# Altium PCB MainBoardPCB_4.PcbDoc (part 23 of 32)
Units mm, origin at the board's own origin, x right, y up, seen from the top; angles counter-clockwise.
Board outline 333.63 x 349.38 mm, 16 copper layers (L1, L2 (GND), L3 (Sign), L4 (GND), L5 (Sign), L6 (PWR/GND), L7(PWR/GND), L8 (Plane_GND), L9 (PWR/GND), L10 (PWR/GND), L11 (PWR/GND), L12 (Sign), L13 (GND), L14 (Sign), L15 (GND), L16), stack 2.502 mm thick; 2205 components, 1648 nets, 8314 pads, 3172 vias.
Unrouted connection lines stored in the file: 5141.
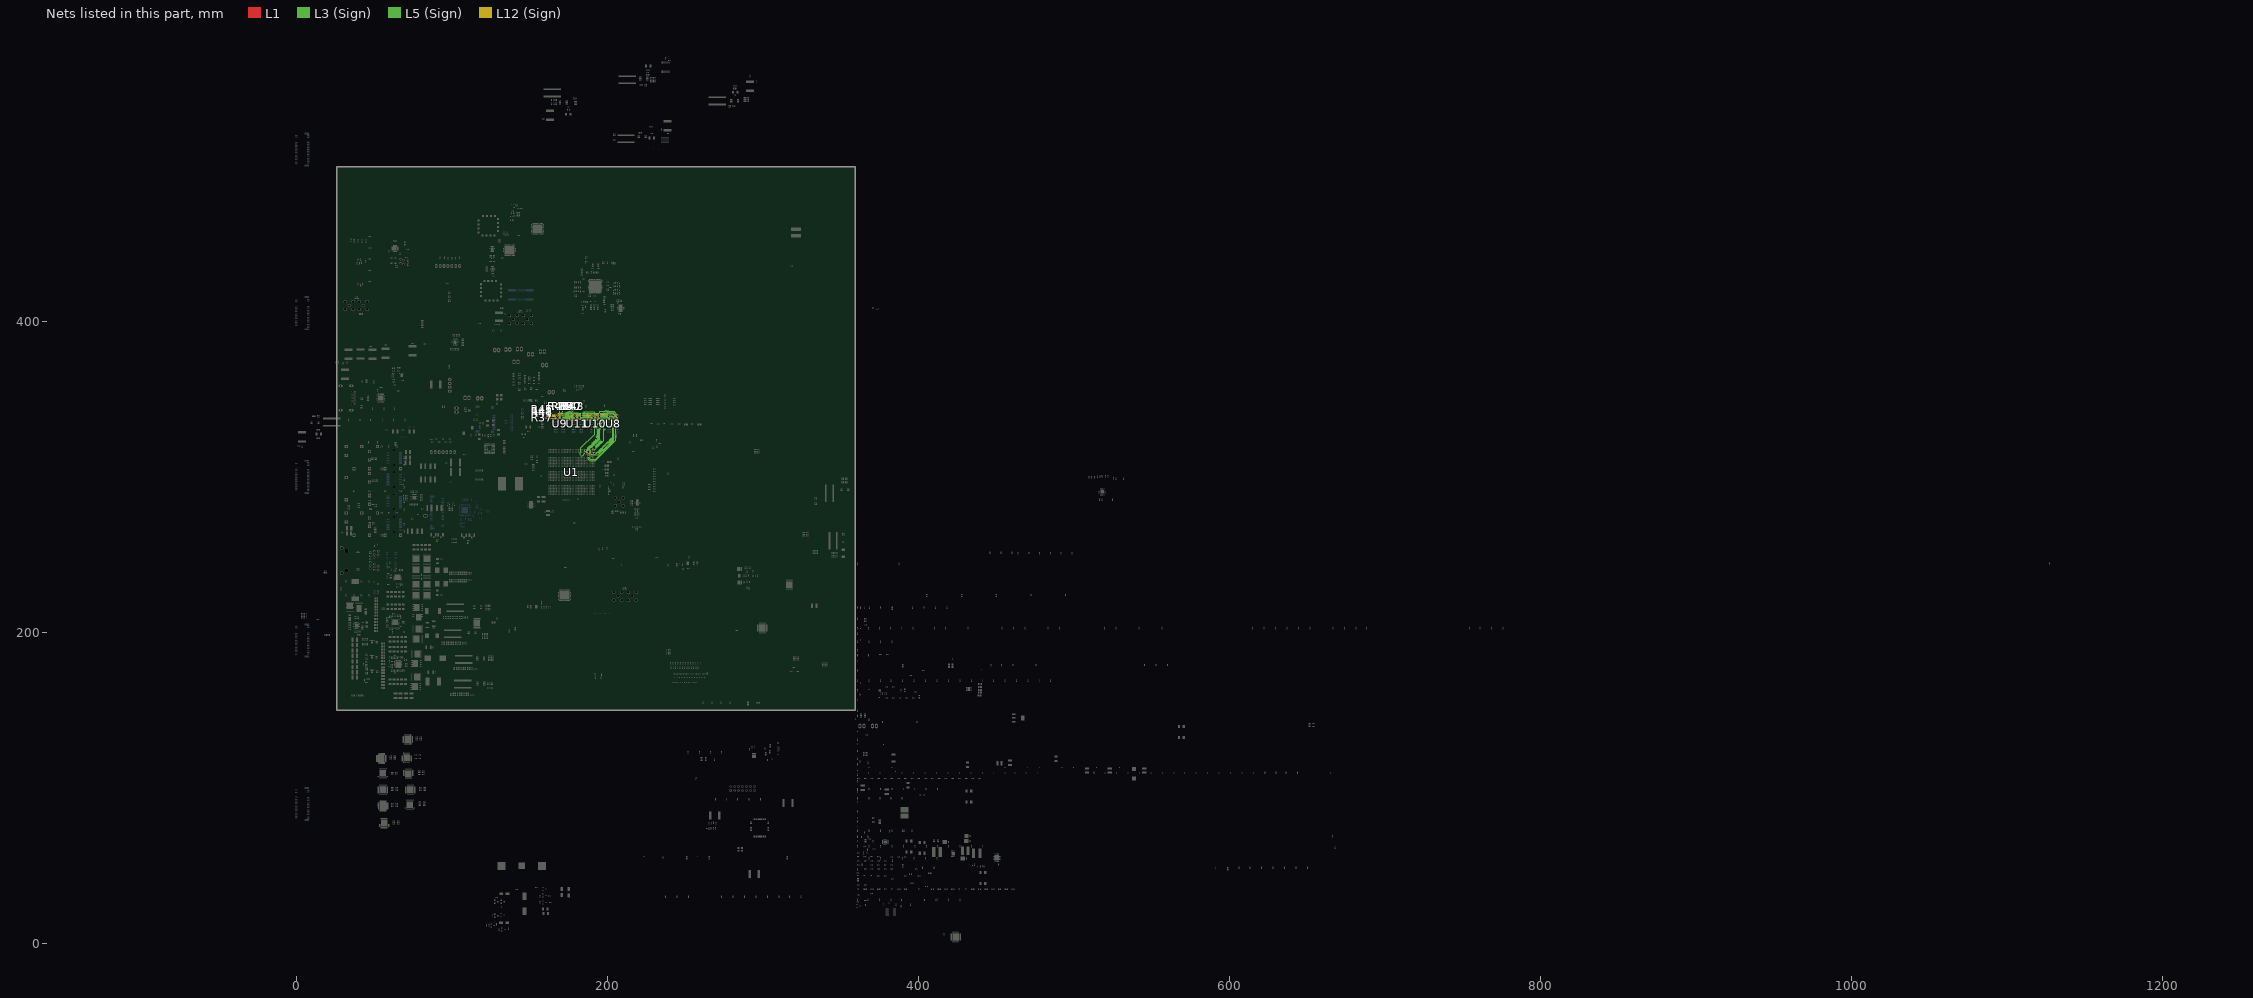
[diagram p23: the nets of this part, all layers, seen from the top]

## Via types
v1: diameter 0.5, hole 0.2, L1 to L16, tented both sides, 1153 vias
v2: diameter 0.5/0.35/0.35/0.35/0.35/0.35/0.35/0.35/0.35/0.35/0.35/0.35/0.35/0.35/0.35/0.5 (per signal layer), hole 0.2, L1 to L16, tented both sides, 548 vias
v3: diameter 0.5, hole 0.2, L1 to L16, 522 vias
v4: diameter 0.5/0.35/0.35/0.35/0.35/0.35/0.35/0.35/0.35/0.35/0.35/0.35/0.35/0.35/0.35/0.5 (per signal layer), hole 0.15, L1 to L16, tented both sides, 266 vias
v5: diameter 0.8, hole 0.4, L1 to L16, tented both sides, 164 vias
v6: diameter 0.35/0/0.35 (per signal layer), hole 0.127, L1 to L3 (Sign), tented both sides, 132 vias
v7: diameter 2.54, hole 1.02, L1 to L16, 125 vias
v8: diameter 1.4, hole 0.5, L1 to L16, tented both sides, 80 vias
v9: diameter 0.35, hole 0.127, L1 to L2 (GND), tented both sides, 36 vias
v10: diameter 0.4, hole 0.2, L1 to L16, 16 vias
v11: diameter 0.25, hole 0.2, L1 to L16, 16 vias
v12: diameter 5, hole 3, L1 to L16, 15 vias
v13: diameter 0.3, hole 0.2, L1 to L16, 15 vias
v14: diameter 0.45, hole 0.15, L1 to L16, 12 vias
v15: diameter 0.5/0.35/0.35/0.35/0.35/0.35/0.35/0.35/0.35/0.35/0.35/0.35/0.35/0.35/0.35/0.45 (per signal layer), hole 0.15, L1 to L16, tented both sides, 10 vias
v16: diameter 0.2/0/0.2 (per signal layer), hole 0.1, L1 to L3 (Sign), tented both sides, 9 vias
v17: diameter 0.4, hole 0.1, L1 to L16, 7 vias
v18: diameter 0.5, hole 0.2, L3 (Sign) to L6 (PWR/GND), tented both sides, 6 vias
v19: diameter 1.65, hole 1.65, L1 to L16, 6 vias
v20: diameter 1.15, hole 1.15, L1 to L16, 6 vias
v21: diameter 0.35/0/0.35 (per signal layer), hole 0.127, L14 (Sign) to L16, tented both sides, 5 vias
v22: diameter 0.2, hole 0.1, L1 to L16, 4 vias
v23: diameter 0.4, hole 0.2, L1 to L16, tented both sides, 2 vias
v24: diameter 0.4, hole 0.15, L1 to L16, 2 vias
v25: diameter 0.508, hole 0.127, L1 to L2 (GND), 2 vias
v26: diameter 0.508, hole 0.127, L2 (GND) to L3 (Sign), 2 vias
v27: diameter 0.5/0.35/0.35/0.35/0.35/0.35/0.35/0.35/0.35/0.35/0.35/0.35/0.35/0.35/0.35/0.5 (per signal layer), hole 0.15, L1 to L16, 2 vias
v28: diameter 0.35, hole 0.127, L3 (Sign) to L6 (PWR/GND), tented both sides, 2 vias
v29: diameter 5.5, hole 3.5, L1 to L16, 1 vias
v30: diameter 0.5/0.35/0.35/0.35/0.35/0.35/0.35/0.35/0.35/0.35/0.35/0.35/0.35/0.35/0.35/0.5 (per signal layer), hole 0.2, L1 to L16, 1 vias
v31: diameter 0.35/0.35/0.35 (per signal layer), hole 0.127, L1 to L3 (Sign), tented both sides, 1 vias
v32: diameter 0.45/0/0.45 (per signal layer), hole 0.15, L1 to L3 (Sign), tented both sides, 1 vias
v33: diameter 0.45/0/0.45 (per signal layer), hole 0.2, L14 (Sign) to L16, tented both sides, 1 vias
v34: diameter 0.35, hole 0.127, L2 (GND) to L3 (Sign), 1 vias
v35: diameter 0.35, hole 0.127, L1 to L2 (GND), 1 vias

## Nets (pads, with @x,y where several pads share a name; then routed paths per layer and width w, separated by ;. In a path a pad name is that pad's centre, name@x,y a point inside that pad or via, vN(x,y) a via of type N, cw(c..) or ccw(c..) an arc to the next point about the centre after c; other vN are vias at no path point) (continued)
DDR4_A3: R37.1 U1.AJ30 U8.N4 U9.N4 U10.N4 U11.N4 | length 99.3
  L1 w0.116: U9.N4@167.676,337.66 168.072,338.057 v4(168.075,338.057) ; U11.N4@179.136,337.66 179.533,338.057 v4(179.535,338.057) ; U1.AJ30@190.397,317.539 v6(190.884,318.027) ; U10.N4@190.597,337.66 190.993,338.057 v4(190.995,338.057) ; U8.N4@202.057,337.66 202.453,338.057 v4(202.456,338.057)
  L1 w0.155: R37.1@158.737,337.967 v1(159.982,337.967)
  L12 (Sign) w0.092: 165.251,337.661 166.76,337.661 167.508,337.661 167.896,338.049 v4(168.075,338.057) ; v4@168.075,338.049 168.821,338.049 169.171,337.698 173.927,337.698 175.389,337.698 cw(c175.389,337.609) 175.479,337.609 175.479,337.545 ccw(c175.568,337.545) 175.568,337.456 175.837,337.456 ccw(c175.837,337.545) 175.927,337.545 175.927,337.698 175.927,337.773 cw(c176.016,337.773) 176.016,337.863 176.285,337.863 cw(c176.285,337.773) 176.374,337.773 176.374,337.698 176.374,337.545 ccw(c176.464,337.545) 176.464,337.456 176.733,337.456 ccw(c176.733,337.545) 176.822,337.545 176.822,337.609 cw(c176.912,337.609) 176.912,337.698 177.046,337.698 177.931,337.698 177.934,337.695 178.053,337.695 178.053,337.698 178.201,337.698 178.201,337.695 178.32,337.695 178.323,337.698 178.831,337.698 179.189,338.057 v4@179.533,338.057 ; v4(179.535,338.057) 180.56,338.057 180.95,337.668 184.651,337.668 185.134,338.15 186.39,338.15 186.616,338.15 cw(c186.616,338.081) 186.685,338.081 186.685,337.958 ccw(c186.754,337.958) 186.754,337.889 186.962,337.889 ccw(c186.962,337.958) 187.031,337.958 187.031,338.15 187.031,338.183 cw(c187.1,338.183) 187.1,338.252 187.308,338.252 cw(c187.308,338.183) 187.377,338.183 187.377,338.15 187.377,337.958 ccw(c187.446,337.958) 187.446,337.889 187.654,337.889 ccw(c187.654,337.958) 187.723,337.958 187.723,338.081 cw(c187.793,338.081) 187.793,338.15 187.897,338.15 189.219,338.15 189.633,337.736 190.504,337.736 190.817,338.049 191.312,338.049 191.662,337.698 193.827,337.698 194.311,337.698 cw(c194.311,337.609) 194.4,337.609 ; 194.4,337.608 ccw(c194.49,337.608) 194.49,337.519 194.759,337.519 ccw(c194.759,337.608) 194.848,337.608 ; 194.848,337.609 cw(c194.938,337.609) 194.938,337.698 195.072,337.698 195.123,337.698 195.458,337.363 196.532,337.363 197.232,337.363 cw(c197.232,337.273) 197.321,337.273 197.321,337.214 ccw(c197.411,337.214) 197.411,337.125 197.68,337.125 ccw(c197.68,337.214) 197.769,337.214 197.769,337.273 cw(c197.859,337.273) 197.859,337.363 197.993,337.363 198.352,337.363 ccw(c198.352,337.452) 198.442,337.452 198.442,337.5 cw(c198.531,337.5) 198.531,337.59 198.8,337.59 cw(c198.8,337.5) 198.89,337.5 198.89,337.363 198.89,337.214 ccw(c198.979,337.214) 198.979,337.125 199.248,337.125 ccw(c199.248,337.214) 199.337,337.214 199.337,337.363 cw(c199.427,337.363) 199.427,337.452 199.696,337.452 cw(c199.696,337.363) 199.785,337.363 199.785,337.214 ccw(c199.875,337.214) 199.875,337.125 200.143,337.125 ccw(c200.143,337.214) 200.233,337.214 200.233,337.273 cw(c200.322,337.273) 200.322,337.363 200.457,337.363 201.112,337.363 201.447,337.698 202.097,337.698 v4(202.456,338.057)
  L12 (Sign) w0.151: v1(159.982,337.967) 160.623,337.967 160.928,337.661 165.251,337.661
  L3 (Sign) w0.092: v6(190.884,318.027) 190.884,317.789 191.329,317.344 191.726,317.344 191.867,317.484 192.147,317.765 192.428,318.046 192.709,318.327 192.919,318.537 ccw(c192.849,318.607) 192.919,318.677 192.123,319.474 cw(c192.193,319.544) 192.123,319.614 192.263,319.755 cw(c192.333,319.684) 192.403,319.755 193.2,318.958 ccw(c193.27,319.028) 193.34,318.958 193.481,319.099 ccw(c193.411,319.169) 193.481,319.239 192.684,320.035 cw(c192.754,320.106) 192.684,320.176 192.825,320.316 cw(c192.895,320.246) 192.965,320.316 193.761,319.52 ccw(c193.832,319.59) 193.902,319.52 194.042,319.66 ccw(c193.972,319.73) 194.042,319.8 193.246,320.597 cw(c193.316,320.667) 193.246,320.737 193.386,320.878 cw(c193.456,320.807) 193.526,320.878 194.323,320.081 ccw(c194.393,320.151) 194.463,320.081 194.604,320.221 ccw(c194.533,320.292) 194.604,320.362 193.807,321.158 cw(c193.877,321.228) 193.807,321.299 193.947,321.439 cw(c194.018,321.369) 194.088,321.439 194.884,320.642 ccw(c194.954,320.713) 195.025,320.642 195.165,320.783 ccw(c195.095,320.853) 195.165,320.923 194.368,321.72 cw(c194.439,321.79) 194.368,321.86 194.509,322 cw(c194.579,321.93) 194.649,322 195.446,321.204 ccw(c195.516,321.274) 195.586,321.204 195.726,321.344 ccw(c195.656,321.414) 195.726,321.485 194.93,322.281 cw(c195,322.351) 194.93,322.422 195.07,322.562 cw(c195.14,322.492) 195.211,322.562 196.007,321.765 ccw(c196.077,321.836) 196.148,321.765 196.288,321.906 ccw(c196.218,321.976) 196.288,322.046 195.491,322.843 cw(c195.562,322.913) 195.491,322.983 195.632,323.123 cw(c195.702,323.053) 195.772,323.123 196.569,322.327 ccw(c196.639,322.397) 196.709,322.327 196.92,322.537 197.2,322.818 197.574,323.192 197.574,329.171 197.574,330.229 cw(c197.673,330.229) 197.673,330.328 198.456,330.328 ccw(c198.456,330.427) 198.555,330.427 198.555,330.626 ccw(c198.456,330.626) 198.456,330.725 197.574,330.725 cw(c197.574,330.824) 197.475,330.824 197.475,331.023 cw(c197.574,331.023) 197.574,331.122 197.75,331.122 ccw(c197.75,331.221) 197.849,331.221 197.849,331.42 ccw(c197.75,331.42) 197.75,331.519 197.574,331.519 cw(c197.574,331.618) 197.475,331.618 197.475,331.817 cw(c197.574,331.817) 197.574,331.916 ccw(c197.574,332.015) 197.673,332.015 197.673,332.214 ccw(c197.574,332.214) 197.574,332.313 197.574,332.511 197.574,334.379 200.822,337.627 202.026,337.627 v4(202.456,338.057)
DDR4_A4: R39.1 U1.AK28 U8.N3 U9.N3 U10.N3 U11.N3 | length 98.4
  L1 w0.116: v4(170.472,338.064) U9.N3@170.876,337.66 ; v30(181.933,338.064) U11.N3@182.336,337.66 ; U1.AK28@191.397,315.539 v6(192.086,315.539) ; v4(193.393,338.064) U10.N3@193.797,337.66 ; v15(204.853,338.064) U8.N3@205.257,337.66
  L1 w0.155: v1(171.229,343.555) R39.1@171.229,344.8
  L5 (Sign) w0.092: 170.437,341.085 169.784,340.433 169.784,338.752 v4(170.472,338.064) 171.003,338.064 171.4,338.46 173.698,338.46 173.832,338.46 ccw(c173.832,338.55) 173.922,338.55 173.922,338.672 cw(c174.011,338.672) 174.011,338.762 174.28,338.762 cw(c174.28,338.672) 174.37,338.672 174.37,338.46 174.37,338.249 ccw(c174.459,338.249) 174.459,338.159 174.728,338.159 ccw(c174.728,338.249) 174.817,338.249 174.817,338.371 cw(c174.907,338.371) 174.907,338.46 175.997,338.46 180.482,338.46 180.878,338.064 v30(181.933,338.064) 182.713,338.064 183.109,338.46 185.801,338.46 185.974,338.46 186.251,338.46 cw(c186.251,338.391) 186.32,338.391 186.32,338.15 ccw(c186.39,338.15) 186.39,338.081 186.597,338.081 ccw(c186.597,338.15) 186.666,338.15 186.666,338.46 186.666,338.77 cw(c186.736,338.77) 186.736,338.84 186.943,338.84 cw(c186.943,338.77) 187.013,338.77 187.013,338.53 ccw(c187.082,338.53) 187.082,338.46 187.82,338.46 191.942,338.46 192.339,338.064 v4(193.393,338.064) 193.924,338.064 194.366,338.506 194.564,338.506 196.327,338.506 cw(c196.327,338.416) 196.417,338.416 196.417,338.348 ccw(c196.506,338.348) 196.506,338.258 196.775,338.258 ccw(c196.775,338.348) 196.864,338.348 196.864,338.506 196.864,338.82 cw(c196.954,338.82) 196.954,338.91 197.223,338.91 cw(c197.223,338.82) 197.312,338.82 197.312,338.595 ccw(c197.402,338.595) 197.402,338.506 197.67,338.506 ccw(c197.67,338.595) 197.76,338.595 197.76,338.82 cw(c197.849,338.82) 197.849,338.91 198.118,338.91 cw(c198.118,338.82) 198.208,338.82 198.208,338.595 ccw(c198.297,338.595) 198.297,338.506 198.566,338.506 ccw(c198.566,338.595) 198.656,338.595 198.656,338.82 cw(c198.745,338.82) 198.745,338.91 199.014,338.91 cw(c199.014,338.82) 199.103,338.82 199.103,338.595 ccw(c199.193,338.595) 199.193,338.506 199.462,338.506 ccw(c199.462,338.595) 199.551,338.595 199.551,338.82 cw(c199.641,338.82) 199.641,338.91 199.909,338.91 cw(c199.909,338.82) 199.999,338.82 199.999,338.595 ccw(c200.088,338.595) 200.088,338.506 200.447,338.506 200.805,338.506 cw(c200.805,338.416) 200.895,338.416 200.895,338.348 ccw(c200.984,338.348) 200.984,338.258 201.253,338.258 ccw(c201.253,338.348) 201.342,338.348 201.342,338.416 cw(c201.432,338.416) 201.432,338.506 201.701,338.506 cw(c201.701,338.416) 201.79,338.416 201.79,338.403 ccw(c201.88,338.403) 201.88,338.314 202.148,338.314 ccw(c202.148,338.403) 202.238,338.403 202.238,338.506 202.238,338.82 cw(c202.327,338.82) 202.327,338.91 202.596,338.91 cw(c202.596,338.82) 202.686,338.82 202.686,338.506 202.686,338.317 ccw(c202.775,338.317) 202.775,338.227 203.044,338.227 ccw(c203.044,338.317) 203.134,338.317 203.134,338.416 cw(c203.223,338.416) 203.223,338.506 203.357,338.506 203.799,338.064 v15(204.853,338.064)
  L5 (Sign) w0.151: 170.437,341.085 171.229,341.878 v1(171.229,343.555)
  L3 (Sign) w0.092: v6(192.086,315.539) 192.317,315.539 192.416,315.539 ccw(c192.416,315.639) 192.515,315.639 192.515,315.688 cw(c192.615,315.688) 192.615,315.787 192.813,315.787 cw(c192.813,315.688) 192.912,315.688 192.912,315.539 192.912,315.189 ccw(c193.012,315.189) 193.012,315.089 193.21,315.089 ccw(c193.21,315.189) 193.309,315.189 193.309,315.44 cw(c193.409,315.44) 193.409,315.539 193.543,315.539 193.684,315.68 ; 193.683,315.68 cw(c193.753,315.75) 193.683,315.821 193.823,315.961 cw(c193.894,315.891) 193.964,315.961 ; 193.964,315.961 194.466,315.459 ccw(c194.536,315.529) 194.606,315.459 194.746,315.6 ccw(c194.676,315.67) 194.746,315.74 194.245,316.241 cw(c194.312,316.309) 194.245,316.376 194.391,316.522 cw(c194.458,316.454) 194.526,316.522 195.027,316.021 ccw(c195.097,316.091) 195.167,316.021 195.308,316.161 ccw(c195.238,316.231) 195.308,316.301 194.806,316.803 cw(c194.874,316.87) 194.806,316.938 194.952,317.083 cw(c195.02,317.016) 195.087,317.083 195.588,316.582 ccw(c195.659,316.652) 195.729,316.582 195.869,316.722 ccw(c195.799,316.793) 195.869,316.863 195.368,317.364 cw(c195.435,317.432) 195.368,317.499 195.514,317.645 cw(c195.581,317.577) 195.649,317.645 196.15,317.144 ccw(c196.22,317.214) 196.29,317.144 196.431,317.284 ccw(c196.36,317.354) 196.431,317.424 195.929,317.926 cw(c195.997,317.993) 195.929,318.06 196.075,318.206 cw(c196.143,318.139) 196.21,318.206 196.711,317.705 ccw(c196.782,317.775) 196.852,317.705 196.992,317.845 ccw(c196.922,317.916) 196.992,317.986 196.491,318.487 cw(c196.558,318.554) 196.491,318.622 196.637,318.768 cw(c196.704,318.7) 196.772,318.768 196.848,318.691 ccw(c196.919,318.761) 196.989,318.691 197.129,318.831 ccw(c197.059,318.901) 197.129,318.971 197.052,319.048 cw(c197.12,319.116) 197.052,319.183 197.198,319.329 cw(c197.265,319.262) 197.333,319.329 197.41,319.252 ccw(c197.48,319.322) 197.55,319.252 197.691,319.393 ccw(c197.62,319.463) 197.691,319.533 197.614,319.61 cw(c197.681,319.677) 197.614,319.745 197.759,319.891 cw(c197.827,319.823) 197.894,319.891 197.971,319.814 ccw(c198.042,319.884) 198.112,319.814 198.252,319.954 ccw(c198.182,320.024) 198.252,320.094 198.175,320.171 cw(c198.243,320.239) 198.175,320.306 198.321,320.452 cw(c198.388,320.385) 198.456,320.452 198.533,320.375 ccw(c198.603,320.445) 198.673,320.375 198.814,320.515 ccw(c198.743,320.586) 198.814,320.656 198.737,320.733 cw(c198.804,320.8) 198.737,320.868 198.882,321.013 cw(c198.95,320.946) 199.017,321.013 199.094,320.937 ccw(c199.164,321.007) 199.235,320.937 199.375,321.077 ccw(c199.305,321.147) 199.375,321.217 199.298,321.294 cw(c199.365,321.362) 199.298,321.429 199.444,321.575 cw(c199.511,321.507) 199.579,321.575 199.656,321.498 ccw(c199.726,321.568) 199.796,321.498 199.936,321.638 ccw(c199.866,321.709) 199.936,321.779 199.859,321.856 cw(c199.927,321.923) 199.859,321.991 200.005,322.136 cw(c200.073,322.069) 200.14,322.136 200.354,321.923 ccw(c200.424,321.993) 200.494,321.923 200.635,322.063 ccw(c200.564,322.133) 200.635,322.203 200.421,322.417 cw(c200.488,322.485) 200.421,322.552 200.567,322.698 cw(c200.634,322.63) 200.702,322.698 200.867,322.532 ccw(c200.938,322.602) 201.008,322.532 201.148,322.672 ccw(c201.078,322.743) 201.148,322.813 200.982,322.979 cw(c201.05,323.046) 200.982,323.113 201.128,323.259 cw(c201.196,323.192) 201.263,323.259 201.429,323.094 ccw(c201.499,323.164) 201.569,323.094 201.71,323.234 ccw(c201.639,323.304) 201.71,323.374 201.544,323.54 cw(c201.611,323.607) 201.544,323.675 201.69,323.821 cw(c201.757,323.753) 201.824,323.821 201.99,323.655 ccw(c202.06,323.725) 202.131,323.655 202.271,323.795 ccw(c202.201,323.865) 202.271,323.936 202.105,324.101 cw(c202.173,324.169) 202.105,324.236 202.251,324.382 cw(c202.318,324.315) 202.386,324.382 202.552,324.216 ccw(c202.622,324.287) 202.692,324.216 202.832,324.357 ccw(c202.762,324.427) 202.832,324.497 202.737,324.593 cw(c202.807,324.663) 202.737,324.733 202.927,324.923 203.434,325.43 203.434,335.975 203.707,336.248 203.707,338.149 203.987,338.43 204.642,338.43 204.853,338.218 v15(204.853,338.064)
DDR4_A5: R41.1 U1.AK27 U8.P5 U9.P5 U10.P5 U11.P5 | length 98
  L1 w0.116: U9.P5@166.876,338.46 167.272,338.857 v4(167.275,338.857) ; U11.P5@178.336,338.46 178.733,338.857 v4(178.735,338.857) ; U10.P5@189.797,338.46 190.193,338.857 v4(190.196,338.857) ; U1.AK27@191.397,314.539 v6(191.884,315.027) ; v4(200.853,338.864) U8.P5@201.257,338.46
  L1 w0.155: R41.1@158.737,341.233 v1(159.982,341.233)
  L12 (Sign) w0.092: 165.251,338.857 166.751,338.857 v4(167.275,338.857) 167.465,339.047 167.688,339.047 167.842,339.201 168.3,339.201 169.159,340.06 173.807,340.06 174.282,339.585 174.472,339.395 cw(c174.409,339.332) 174.472,339.269 174.437,339.233 ccw(c174.5,339.17) 174.437,339.106 174.627,338.916 ccw(c174.69,338.98) 174.753,338.916 174.789,338.952 cw(c174.852,338.889) 174.915,338.952 175.01,338.857 v4(178.735,338.857) 179.053,338.857 179.451,339.255 180.302,339.255 181.127,340.081 184.125,340.081 184.945,339.26 186.576,339.26 187.06,339.26 cw(c187.06,339.191) 187.129,339.191 187.129,339.18 ccw(c187.199,339.18) 187.199,339.111 187.406,339.111 ccw(c187.406,339.18) 187.476,339.18 187.476,339.26 187.476,339.337 cw(c187.545,339.337) 187.545,339.407 187.752,339.407 cw(c187.752,339.337) 187.822,339.337 187.822,339.26 187.822,339.18 ccw(c187.891,339.18) 187.891,339.111 188.099,339.111 ccw(c188.099,339.18) 188.168,339.18 188.168,339.191 cw(c188.237,339.191) 188.237,339.26 188.341,339.26 189.268,339.26 189.672,338.857 v4(190.196,338.857) 190.385,339.047 190.609,339.047 190.763,339.201 191.22,339.201 192.08,340.06 195.846,340.06 196.524,339.382 197.193,339.382 198.16,339.382 cw(c198.16,339.293) 198.25,339.293 198.25,338.968 ccw(c198.339,338.968) 198.339,338.878 198.608,338.878 ccw(c198.608,338.968) 198.697,338.968 198.697,339.382 198.697,339.496 cw(c198.787,339.496) 198.787,339.586 199.056,339.586 cw(c199.056,339.496) 199.145,339.496 199.145,339.382 199.145,338.968 ccw(c199.235,338.968) 199.235,338.878 199.504,338.878 ccw(c199.504,338.968) 199.593,338.968 199.593,339.293 cw(c199.683,339.293) 199.683,339.382 199.817,339.382 200.342,338.857 v4@200.861,338.857
  L12 (Sign) w0.151: v1(159.982,341.233) 160.607,341.233 161.446,340.395 161.491,340.395 163.029,338.857 165.251,338.857
  L3 (Sign) w0.092: 189.328,315.928 189.328,316.31 188.563,317.074 188.563,318.187 188.633,318.257 ccw(c188.563,318.327) 188.633,318.398 188.63,318.401 cw(c188.701,318.471) 188.63,318.541 188.771,318.681 cw(c188.841,318.611) 188.911,318.681 188.984,318.608 189.016,318.576 ccw(c189.087,318.646) 189.157,318.576 189.297,318.717 ccw(c189.227,318.787) 189.297,318.857 189.265,318.889 189.192,318.962 cw(c189.262,319.032) 189.192,319.103 189.332,319.243 cw(c189.402,319.173) 189.473,319.243 189.546,319.17 189.786,318.929 ccw(c189.856,319) 189.926,318.929 190.067,319.07 ccw(c189.997,319.14) 190.067,319.21 189.827,319.45 189.753,319.524 cw(c189.823,319.594) 189.753,319.664 189.894,319.804 cw(c189.964,319.734) 190.034,319.804 190.107,319.731 190.347,319.491 ccw(c190.418,319.561) 190.488,319.491 190.628,319.631 ccw(c190.558,319.701) 190.628,319.772 190.388,320.012 190.315,320.085 cw(c190.385,320.155) 190.315,320.225 190.455,320.366 cw(c190.525,320.296) 190.595,320.366 190.669,320.293 190.909,320.052 ccw(c190.979,320.123) 191.049,320.052 191.19,320.193 ccw(c191.119,320.263) 191.19,320.333 190.949,320.573 190.876,320.647 cw(c190.946,320.717) 190.876,320.787 191.016,320.927 cw(c191.087,320.857) 191.157,320.927 191.23,320.854 191.47,320.614 ccw(c191.54,320.684) 191.611,320.614 191.751,320.754 ccw(c191.681,320.824) 191.751,320.895 191.511,321.135 191.438,321.208 cw(c191.508,321.278) 191.438,321.348 191.578,321.489 cw(c191.648,321.419) 191.718,321.489 191.792,321.415 192.032,321.175 ccw(c192.102,321.245) 192.172,321.175 192.312,321.316 ccw(c192.242,321.386) 192.312,321.456 192.072,321.696 191.999,321.769 cw(c192.069,321.84) 191.999,321.91 192.139,322.05 cw(c192.21,321.98) 192.28,322.05 192.353,321.977 192.593,321.737 ccw(c192.663,321.807) 192.734,321.737 192.874,321.877 ccw(c192.804,321.947) 192.874,322.017 192.634,322.258 192.56,322.331 cw(c192.631,322.401) 192.56,322.471 192.701,322.612 cw(c192.771,322.541) 192.841,322.612 192.914,322.538 193.155,322.298 ccw(c193.225,322.368) 193.295,322.298 193.435,322.439 ccw(c193.365,322.509) 193.435,322.579 193.195,322.819 193.122,322.892 cw(c193.192,322.962) 193.122,323.033 193.262,323.173 cw(c193.332,323.103) 193.403,323.173 193.476,323.1 193.716,322.86 ccw(c193.786,322.93) 193.856,322.86 193.997,323 ccw(c193.927,323.07) 193.997,323.14 193.757,323.38 193.683,323.454 cw(c193.754,323.524) 193.683,323.594 193.824,323.734 cw(c193.894,323.664) 193.964,323.734 194.037,323.661 194.278,323.421 ccw(c194.348,323.491) 194.418,323.421 194.558,323.561 ccw(c194.488,323.632) 194.558,323.702 194.318,323.942 194.245,324.015 cw(c194.315,324.085) 194.245,324.156 194.385,324.296 cw(c194.455,324.226) 194.526,324.296 194.599,324.223 194.839,323.982 ccw(c194.909,324.053) 194.979,323.982 195.12,324.123 ccw(c195.049,324.193) 195.12,324.263 194.95,324.433 cw(c195.02,324.503) 194.95,324.574 195.212,324.836 195.212,330.648 195.631,331.067 195.631,331.483 196.438,332.29 196.438,334.652 200.643,338.857 200.861,338.857 v4(200.853,338.864) ; 189.332,315.928 189.332,315.746 188.956,315.37 188.907,315.37 188.718,315.182 188.718,314.916 188.907,314.728 189.391,314.728 189.605,314.514 190.167,314.514 190.322,314.668 191.091,314.668 191.271,314.847 191.271,315.413 191.419,315.562 191.671,315.562 191.711,315.522 191.711,315.2 v6(191.884,315.027)
DDR4_A6: R43.1 U1.AF27 U8.P2 U9.P2 U10.P2 U11.P2 | length 102.8
  L1 w0.116: U9.P2@171.676,338.46 v4(172.079,338.864) ; U11.P2@183.136,338.46 v4(183.54,338.864) ; U1.AF27@187.397,314.539 v6(187.884,314.052) ; U10.P2@194.597,338.46 v4(195,338.864) ; U8.P2@206.057,338.46 v4(206.461,338.864)
  L1 w0.155: v6(178.481,343.555) R43.1@178.481,344.799
  L5 (Sign) w0.092: v4(172.079,338.864) 173.515,338.864 173.911,339.26 174.6,339.26 174.734,339.26 ccw(c174.734,339.35) 174.823,339.35 174.823,339.393 cw(c174.913,339.393) 174.913,339.482 175.182,339.482 cw(c175.182,339.393) 175.271,339.393 175.271,339.26 175.271,339.128 ccw(c175.361,339.128) 175.361,339.039 175.63,339.039 ccw(c175.63,339.128) 175.719,339.128 175.719,339.171 cw(c175.809,339.171) 175.809,339.26 176.187,339.26 180.228,339.26 181.008,338.48 182.583,338.48 182.966,338.864 v4(183.54,338.864) 183.839,338.864 184.217,339.242 184.404,339.242 184.577,339.242 184.854,339.242 cw(c184.854,339.173) 184.923,339.173 184.923,339.008 ccw(c184.993,339.008) 184.993,338.939 185.2,338.939 ccw(c185.2,339.008) 185.269,339.008 185.269,339.242 185.269,339.477 cw(c185.339,339.477) 185.339,339.546 185.546,339.546 cw(c185.546,339.477) 185.616,339.477 185.616,339.312 ccw(c185.685,339.312) 185.685,339.242 186.195,339.242 191.707,339.242 192.469,338.48 194.043,338.48 194.427,338.864 v4(195,338.864) 195.227,338.864 195.623,339.26 195.77,339.26 196.189,339.26 cw(c196.189,339.171) 196.279,339.171 196.279,339.017 ccw(c196.369,339.017) 196.369,338.927 196.637,338.927 ccw(c196.637,339.017) 196.727,339.017 196.727,339.26 196.727,339.523 cw(c196.816,339.523) 196.816,339.613 197.085,339.613 cw(c197.085,339.523) 197.175,339.523 197.175,339.26 197.175,339.192 ccw(c197.264,339.192) 197.264,339.103 197.533,339.103 ccw(c197.533,339.192) 197.622,339.192 197.622,339.26 197.622,339.523 cw(c197.712,339.523) 197.712,339.613 197.981,339.613 cw(c197.981,339.523) 198.07,339.523 198.07,339.26 198.07,339.192 ccw(c198.16,339.192) 198.16,339.103 198.428,339.103 ccw(c198.428,339.192) 198.518,339.192 198.518,339.26 198.518,339.523 cw(c198.608,339.523) 198.608,339.613 198.876,339.613 cw(c198.876,339.523) 198.966,339.523 198.966,339.26 198.966,339.192 ccw(c199.055,339.192) 199.055,339.103 199.324,339.103 ccw(c199.324,339.192) 199.414,339.192 199.414,339.26 199.414,339.523 cw(c199.503,339.523) 199.503,339.613 199.772,339.613 cw(c199.772,339.523) 199.861,339.523 199.861,339.26 199.861,339.192 ccw(c199.951,339.192) 199.951,339.103 200.22,339.103 ccw(c200.22,339.192) 200.309,339.192 200.309,339.26 200.309,339.295 cw(c200.399,339.295) 200.399,339.385 200.667,339.385 cw(c200.667,339.295) 200.757,339.295 200.757,339.26 ccw(c200.833,339.26) 200.833,339.185 201.129,339.185 ccw(c201.129,339.26) 201.205,339.26 201.429,339.26 203.149,339.26 203.944,338.465 204.078,338.465 ccw(c204.078,338.555) 204.168,338.555 204.168,338.578 cw(c204.257,338.578) 204.257,338.668 204.526,338.668 cw(c204.526,338.578) 204.616,338.578 204.616,338.555 ccw(c204.705,338.555) 204.705,338.465 204.98,338.465 205.489,338.465 205.887,338.864 v4(206.461,338.864)
  L3 (Sign) w0.092: v4(172.079,338.864) 173.022,339.807 174.25,339.807 174.969,340.525 176.05,340.525 176.611,341.085 ; v6(187.884,314.052) 187.884,314.03 188.511,313.403 188.511,311.882 188.986,311.406 192.691,311.406 197.601,316.317 197.671,316.387 ccw(c197.601,316.457) 197.671,316.527 197.317,316.882 cw(c197.387,316.953) 197.317,317.023 197.457,317.163 cw(c197.527,317.093) 197.597,317.163 197.952,316.808 ccw(c198.022,316.878) 198.093,316.808 198.233,316.949 ccw(c198.163,317.019) 198.233,317.089 197.878,317.444 cw(c197.948,317.514) 197.878,317.584 198.018,317.725 cw(c198.088,317.654) 198.159,317.725 198.514,317.37 ccw(c198.584,317.44) 198.654,317.37 198.794,317.51 ccw(c198.724,317.58) 198.794,317.65 198.439,318.005 cw(c198.51,318.076) 198.439,318.146 198.58,318.286 cw(c198.65,318.216) 198.72,318.286 199.075,317.931 ccw(c199.145,318.001) 199.215,317.931 199.356,318.071 ccw(c199.286,318.142) 199.356,318.212 199.001,318.567 cw(c199.071,318.637) 199.001,318.707 199.141,318.847 cw(c199.211,318.777) 199.282,318.847 199.636,318.493 ccw(c199.707,318.563) 199.777,318.493 199.917,318.633 ccw(c199.847,318.703) 199.917,318.773 199.562,319.129 cw(c199.632,319.199) 199.562,319.269 199.702,319.409 cw(c199.772,319.339) 199.843,319.409 200.198,319.054 ccw(c200.268,319.124) 200.338,319.054 200.549,319.265 202.023,320.738 204.01,322.725 204.01,335.707 204.363,336.06 205.816,336.06 206.088,336.332 206.088,337.358 205.791,337.655 205.791,338.496 206.148,338.853 206.449,338.853 v4(206.461,338.864)
  L3 (Sign) w0.151: 176.611,341.085 178.486,342.961 178.486,343.55 v6(178.481,343.555)
DDR4_A7: R45.1 U1.AE27 U8.R5 U9.R5 U10.R5 U11.R5 | length 100.7
  L1 w0.116: U9.R5@166.876,339.26 v4(167.279,339.664) ; U11.R5@178.336,339.26 178.733,339.657 v4(178.735,339.657) ; U1.AE27@186.397,314.539 v6(186.884,315.027) v6@186.884,315.052 ; U10.R5@189.797,339.26 190.193,339.657 v4(190.195,339.657) ; v4(200.853,339.664) U8.R5@201.257,339.26
  L1 w0.155: R45.1@158.737,343.411 v1(159.982,343.411)
  L12 (Sign) w0.092: 165.251,340.06 166.076,340.06 166.576,339.56 167.178,339.56 168.598,340.981 174.981,340.981 175.248,340.981 cw(c175.248,340.891) 175.338,340.891 ccw(c175.427,340.891) 175.427,340.802 175.696,340.802 ccw(c175.696,340.891) 175.785,340.891 cw(c175.875,340.891) 175.875,340.981 176.009,340.981 176.93,340.06 178.332,340.06 v4(178.735,339.657) 178.926,339.657 179.248,339.979 180.276,339.979 181.331,341.033 183.851,341.033 184.027,340.858 186.118,340.858 186.416,340.858 ccw(c186.416,340.927) 186.485,340.927 186.485,340.965 cw(c186.554,340.965) 186.554,341.034 186.762,341.034 cw(c186.762,340.965) 186.831,340.965 186.831,340.858 186.831,340.751 ccw(c186.9,340.751) 186.9,340.682 187.108,340.682 ccw(c187.108,340.751) 187.177,340.751 187.177,340.789 cw(c187.247,340.789) 187.247,340.858 187.35,340.858 188.995,340.858 v4(190.195,339.657) ; v4@190.098,339.56 v4(190.195,339.657) ; v4@200.853,339.657 200.449,339.657 199.466,340.639 199.314,340.639 198.92,340.639 cw(c198.92,340.729) 198.83,340.729 198.83,340.798 ccw(c198.741,340.798) 198.741,340.887 198.472,340.887 ccw(c198.472,340.798) 198.382,340.798 198.382,340.639 198.382,340.481 cw(c198.293,340.481) 198.293,340.392 198.024,340.392 cw(c198.024,340.481) 197.935,340.481 197.935,340.639 197.935,340.798 ccw(c197.845,340.798) 197.845,340.887 197.576,340.887 ccw(c197.576,340.798) 197.487,340.798 197.487,340.639 197.487,340.481 cw(c197.397,340.481) 197.397,340.392 197.129,340.392 cw(c197.129,340.481) 197.039,340.481 197.039,340.639 197.039,340.798 ccw(c196.95,340.798) 196.95,340.887 196.681,340.887 ccw(c196.681,340.798) 196.591,340.798 196.591,340.729 cw(c196.502,340.729) 196.502,340.639 196.367,340.639 196.026,340.981 191.519,340.981 v4(190.195,339.657)
  L12 (Sign) w0.151: v1(159.982,343.411) 161.325,343.411 164.676,340.06 165.251,340.06
  L3 (Sign) w0.092: v6(186.884,315.027) 186.884,315.074 186.615,315.344 185.419,316.539 185.419,317.004 185.788,317.373 186.627,317.373 187.413,318.148 187.554,318.287 187.598,318.331 187.669,318.4 ccw(c187.599,318.471) 187.67,318.541 187.526,318.687 cw(c187.596,318.757) 187.527,318.828 187.668,318.967 cw(c187.738,318.896) 187.808,318.966 188.023,318.749 188.068,318.703 ccw(c188.139,318.772) 188.208,318.702 188.35,318.841 ccw(c188.28,318.912) 188.351,318.981 188.305,319.028 188.083,319.253 cw(c188.154,319.323) 188.084,319.394 188.225,319.533 cw(c188.295,319.462) 188.366,319.532 188.588,319.306 188.629,319.264 ccw(c188.7,319.334) 188.77,319.263 188.911,319.403 ccw(c188.841,319.473) 188.912,319.543 188.871,319.585 188.676,319.782 cw(c188.747,319.852) 188.677,319.922 188.819,320.062 cw(c188.888,319.991) 188.959,320.061 189.153,319.864 189.191,319.826 ccw(c189.262,319.895) 189.331,319.825 189.473,319.964 ccw(c189.403,320.035) 189.474,320.104 189.436,320.142 189.428,320.15 cw(c189.499,320.22) 189.429,320.291 189.571,320.43 cw(c189.64,320.359) 189.711,320.429 ; 189.711,320.429 189.695,320.445 ccw(c189.719,320.469) 189.743,320.445 190.002,320.7 190.066,320.764 190.137,320.834 ccw(c190.067,320.904) 190.138,320.974 189.949,321.166 cw(c190.02,321.235) 189.95,321.306 190.092,321.445 cw(c190.161,321.375) 190.232,321.444 190.491,321.182 190.519,321.153 ccw(c190.589,321.223) 190.659,321.152 190.8,321.292 ccw(c190.731,321.362) 190.801,321.432 190.773,321.461 190.506,321.731 cw(c190.577,321.801) 190.507,321.872 190.649,322.011 cw(c190.718,321.94) 190.789,322.01 191.056,321.739 191.08,321.715 ccw(c191.151,321.785) 191.22,321.714 191.362,321.853 ccw(c191.292,321.924) 191.363,321.994 191.339,322.018 191.072,322.289 cw(c191.142,322.359) 191.073,322.429 191.214,322.569 cw(c191.284,322.498) 191.354,322.568 191.621,322.297 191.642,322.276 ccw(c191.712,322.346) 191.782,322.275 191.923,322.415 ccw(c191.854,322.485) 191.924,322.555 191.904,322.575 191.633,322.85 cw(c191.704,322.92) 191.634,322.991 191.775,323.13 cw(c191.845,323.059) 191.916,323.129 192.187,322.854 192.203,322.838 ccw(c192.274,322.907) 192.343,322.837 192.485,322.976 ccw(c192.415,323.047) 192.486,323.117 192.47,323.133 192.195,323.412 cw(c192.265,323.481) 192.196,323.552 192.337,323.692 cw(c192.407,323.621) 192.477,323.691 192.752,323.412 192.764,323.399 ccw(c192.835,323.469) 192.905,323.398 193.046,323.538 ccw(c192.976,323.608) 193.047,323.678 ; 193.047,323.678 193.063,323.662 cw(c193.092,323.69) 193.064,323.718 193.661,324.307 193.764,324.409 ; 193.764,324.508 193.764,324.409 ; v4(200.853,339.664) 200.804,339.615 200.541,339.615 195.387,334.46 194.068,334.46 193.764,334.156 193.764,333.439 192.865,332.54 192.865,331.238 193.764,330.34 193.764,330.141 cw(c193.764,330.083) 193.822,330.083 193.822,329.802 cw(c193.764,329.802) 193.764,329.744 193.764,329.347 cw(c193.764,329.291) 193.82,329.291 193.82,329.006 cw(c193.764,329.006) 193.764,328.95 193.63,328.95 ccw(c193.63,328.851) 193.531,328.851 193.531,328.652 ccw(c193.63,328.652) 193.63,328.553 193.764,328.553 cw(c193.764,328.497) 193.82,328.497 193.82,328.212 cw(c193.764,328.212) 193.764,328.156 193.764,327.759 cw(c193.764,327.703) 193.82,327.703 193.82,327.418 cw(c193.764,327.418) 193.764,327.362 193.65,327.362 ccw(c193.65,327.263) 193.55,327.263 193.55,327.064 ccw(c193.65,327.064) 193.65,326.965 193.764,326.965 cw(c193.764,326.909) 193.82,326.909 193.82,326.624 cw(c193.764,326.624) 193.764,326.568 192.965,326.568 ccw(c192.965,326.469) 192.865,326.469 192.865,326.27 ccw(c192.965,326.27) 192.965,326.171 193.764,326.171 cw(c193.764,326.115) 193.82,326.115 193.82,325.83 cw(c193.764,325.83) 193.764,325.774 192.965,325.774 ccw(c192.965,325.675) 192.865,325.675 192.865,325.476 ccw(c192.965,325.476) 192.965,325.377 193.764,325.377 194.28,325.377 cw(c194.28,325.278) 194.379,325.278 194.379,325.079 cw(c194.28,325.079) 194.28,324.98 193.863,324.98 ccw(c193.863,324.881) 193.764,324.881 193.764,324.583 193.764,324.409
DDR4_A8: R47.1 U1.AF26 U8.R2 U9.R2 U10.R2 U11.R2 | length 102.5
  L1 w0.116: U9.R2@171.676,339.26 v4(172.079,339.664) ; U11.R2@183.136,339.26 v4(183.54,339.664) ; U1.AF26@187.397,313.539 v6(187.884,313.052) ; U10.R2@194.597,339.26 v4(195,339.664) ; U8.R2@206.057,339.26 v4(206.461,339.664)
  L1 w0.155: v6(177.272,343.555) R47.1@177.272,344.8
  L5 (Sign) w0.092: 170.852,339.343 171.173,339.664 v4(172.079,339.664) 173.045,339.664 174.17,340.789 179.911,340.789 180.239,340.462 181.44,339.26 182.336,339.26 182.74,339.664 v4(183.54,339.664) 184.803,340.927 184.976,340.927 185.253,340.927 cw(c185.253,340.858) 185.322,340.858 185.322,340.794 ccw(c185.391,340.794) 185.391,340.725 185.599,340.725 ccw(c185.599,340.794) 185.668,340.794 185.668,340.858 cw(c185.737,340.858) 185.737,340.927 186.118,340.927 191.377,340.927 193.044,339.26 193.797,339.26 194.2,339.664 v4(195,339.664) 195.408,339.664 195.846,340.102 195.846,340.481 196.292,340.927 200.774,340.927 200.965,340.927 201.355,340.927 cw(c201.355,340.867) 201.415,340.867 201.415,340.875 ; 201.415,340.875 ccw(c201.504,340.875) 201.504,340.786 201.773,340.786 ccw(c201.773,340.875) 201.862,340.875 201.862,340.927 201.862,341.236 cw(c201.952,341.236) 201.952,341.326 202.221,341.326 cw(c202.221,341.236) 202.31,341.236 202.31,340.927 202.31,340.618 ccw(c202.4,340.618) 202.4,340.528 202.669,340.528 ccw(c202.669,340.618) 202.758,340.618 202.758,340.927 202.758,341.236 cw(c202.848,341.236) 202.848,341.326 203.116,341.326 cw(c203.116,341.236) 203.206,341.236 203.206,340.927 203.206,340.618 ccw(c203.295,340.618) 203.295,340.528 203.564,340.528 ccw(c203.564,340.618) 203.654,340.618 203.654,340.837 cw(c203.743,340.837) 203.743,340.927 203.878,340.927 204.038,340.766 204.038,339.801 204.579,339.26 205.257,339.26 205.661,339.664 v4(206.461,339.664)
  L3 (Sign) w0.092: v4(172.079,339.664) 172.613,340.198 173.831,340.198 174.719,341.085 ; v6(187.884,313.052) 187.884,311.416 188.879,310.422 192.299,310.422 205.282,323.405 205.282,324.904 205.282,325.003 ccw(c205.183,325.003) 205.183,325.103 205.032,325.103 cw(c205.032,325.202) 204.932,325.202 204.932,325.4 cw(c205.032,325.4) 205.032,325.5 205.282,325.5 205.732,325.5 ccw(c205.732,325.599) 205.832,325.599 205.832,325.797 ccw(c205.732,325.797) 205.732,325.897 205.282,325.897 205.032,325.897 cw(c205.032,325.996) 204.932,325.996 204.932,326.194 cw(c205.032,326.194) 205.032,326.294 205.282,326.294 205.732,326.294 ccw(c205.732,326.393) 205.832,326.393 205.832,326.591 ccw(c205.732,326.591) 205.732,326.691 205.282,326.691 205.106,326.691 cw(c205.106,326.79) 205.007,326.79 205.007,326.988 cw(c205.106,326.988) 205.106,327.088 205.282,327.088 205.732,327.088 ccw(c205.732,327.187) 205.832,327.187 205.832,327.385 ccw(c205.732,327.385) 205.732,327.485 205.382,327.485 cw(c205.382,327.584) 205.282,327.584 205.282,328.324 205.282,334.975 205.524,335.216 206.013,335.216 206.628,335.831 206.628,337.288 206.042,337.873 206.042,338.3 206.286,338.544 206.327,338.544 206.328,338.543 206.593,338.543 206.594,338.544 206.604,338.544 206.781,338.722 206.781,338.731 206.782,338.997 206.781,339.343 v4(206.461,339.664)
  L3 (Sign) w0.151: 174.719,341.085 175.049,341.085 177.272,343.308 v6(177.272,343.555)
DDR4_A9: R48.1 U1.AG26 U8.R4 U9.R4 U10.R4 U11.R4 | length 100.8
  L1 w0.116: U9.R4@167.676,339.26 v4(168.079,339.664) ; U11.R4@179.136,339.26 179.533,339.657 v4(179.535,339.657) ; U1.AG26@188.397,313.539 v6(188.884,314.027) ; U10.R4@190.597,339.26 190.993,339.657 v3(190.995,339.657) ; v3(201.653,339.664) U8.R4@202.057,339.26
  L1 w0.155: R48.1@158.737,342.322 v1(159.982,342.322)
  L12 (Sign) w0.092: 165.251,339.26 167.443,339.26 167.847,339.664 v4(168.079,339.664) 169.204,340.789 174.119,340.789 175.648,339.26 179.139,339.26 v4(179.535,339.657) 180.231,339.657 181.416,340.841 183.771,340.841 184.551,340.06 186.099,340.06 187.511,340.06 cw(c187.511,339.991) 187.58,339.991 187.58,339.901 ccw(c187.65,339.901) 187.65,339.831 187.857,339.831 ccw(c187.857,339.901) 187.927,339.901 187.927,339.991 cw(c187.996,339.991) 187.996,340.06 188.1,340.06 188.981,340.06 189.802,339.239 190.306,339.239 190.724,339.657 v3(190.995,339.657) 192.127,340.789 195.824,340.789 196.685,339.928 196.736,339.928 197.089,339.928 ccw(c197.089,340.018) 197.178,340.018 197.178,340.099 cw(c197.268,340.099) 197.268,340.189 197.537,340.189 cw(c197.537,340.099) 197.626,340.099 197.626,339.928 197.626,339.674 ccw(c197.716,339.674) 197.716,339.585 197.984,339.585 ccw(c197.984,339.674) 198.074,339.674 198.074,339.839 cw(c198.163,339.839) 198.163,339.928 198.298,339.928 198.611,339.928 ccw(c198.611,340.018) 198.7,340.018 198.7,340.234 cw(c198.79,340.234) 198.79,340.324 199.059,340.324 cw(c199.059,340.234) 199.148,340.234 199.148,339.928 199.148,339.83 ccw(c199.238,339.83) 199.238,339.741 199.506,339.741 ccw(c199.506,339.83) 199.596,339.83 199.596,339.839 cw(c199.686,339.839) 199.686,339.928 199.82,339.928 200.412,339.336 201.325,339.336 v3(201.653,339.664)
  L12 (Sign) w0.151: v1(159.982,342.322) 160.864,342.322 163.926,339.26 165.251,339.26
  L3 (Sign) w0.092: v6(188.884,314.027) 188.884,314.479 188.527,314.836 188.527,315.261 188.827,315.562 188.876,315.562 189.128,315.814 189.128,315.952 189.132,315.955 189.132,316.221 188.944,316.409 188.939,316.409 188.266,317.082 188.266,317.118 188.034,317.35 187.998,317.35 187.973,317.375 187.657,317.375 187.413,317.13 187.413,316.905 187.22,316.713 186.991,316.713 186.76,316.944 186.76,317.167 187.715,318.122 187.935,318.122 194.571,324.759 194.571,325.552 ccw(c194.498,325.552) 194.498,325.625 194.15,325.625 cw(c194.15,325.724) 194.051,325.724 194.051,325.923 cw(c194.15,325.923) 194.15,326.022 194.571,326.022 194.882,326.022 ccw(c194.882,326.121) 194.981,326.121 194.981,326.32 ccw(c194.882,326.32) 194.882,326.419 194.571,326.419 194.15,326.419 cw(c194.15,326.518) 194.051,326.518 194.051,326.717 cw(c194.15,326.717) 194.15,326.816 194.571,326.816 194.882,326.816 ccw(c194.882,326.915) 194.981,326.915 194.981,327.114 ccw(c194.882,327.114) 194.882,327.213 194.571,327.213 194.15,327.213 cw(c194.15,327.312) 194.051,327.312 194.051,327.511 cw(c194.15,327.511) 194.15,327.61 194.571,327.61 194.882,327.61 ccw(c194.882,327.709) 194.981,327.709 194.981,327.908 ccw(c194.882,327.908) 194.882,328.007 194.571,328.007 194.15,328.007 cw(c194.15,328.106) 194.051,328.106 194.051,328.305 cw(c194.15,328.305) 194.15,328.404 194.571,328.404 194.882,328.404 ccw(c194.882,328.503) 194.981,328.503 194.981,328.702 ccw(c194.882,328.702) 194.882,328.801 194.571,328.801 194.15,328.801 cw(c194.15,328.9) 194.051,328.9 194.051,329.099 cw(c194.15,329.099) 194.15,329.198 194.571,329.198 194.882,329.198 ccw(c194.882,329.297) 194.981,329.297 194.981,329.496 ccw(c194.882,329.496) 194.882,329.595 194.67,329.595 cw(c194.67,329.694) 194.571,329.694 194.571,329.794 194.571,330.695 196.222,332.346 196.222,332.376 196.222,332.475 ccw(c196.122,332.475) 196.122,332.574 195.26,332.574 cw(c195.26,332.674) 195.161,332.674 195.161,332.872 cw(c195.26,332.872) 195.26,332.971 196.122,332.971 ccw(c196.122,333.071) 196.222,333.071 196.222,333.269 ccw(c196.122,333.269) 196.122,333.368 195.424,333.368 cw(c195.424,333.468) 195.325,333.468 195.325,333.666 cw(c195.424,333.666) 195.424,333.765 196.122,333.765 ccw(c196.122,333.865) 196.222,333.865 196.222,334.162 196.222,334.796 200.681,339.255 201.536,339.255 201.653,339.372 v3(201.653,339.664)
DDR4_A10: R49.1 U1.AE29 U8.M3 U9.M3 U10.M3 U11.M3 | length 101.4
  L1 w0.116: v4(170.472,337.264) U9.M3@170.876,336.86 ; v4(181.933,337.264) U11.M3@182.336,336.86 ; v6(185.91,317.027) U1.AE29@186.397,316.539 ; v4(193.393,337.264) U10.M3@193.797,336.86 ; v15(204.853,337.264) U8.M3@205.257,336.86
  L1 w0.155: v1(168.812,343.555) R49.1@168.812,344.799
  L5 (Sign) w0.092: 169.377,341.085 169.377,337.887 170.001,337.264 v4(170.472,337.264) 170.709,337.501 171.075,337.501 171.242,337.668 172.6,337.668 173.4,336.868 175.006,336.868 175.145,336.868 cw(c175.145,336.808) 175.204,336.808 ccw(c175.264,336.808) 175.264,336.748 175.542,336.748 ccw(c175.542,336.808) 175.601,336.808 175.601,336.868 175.601,337.113 cw(c175.661,337.113) 175.661,337.173 175.939,337.173 cw(c175.939,337.113) 175.998,337.113 175.998,336.927 ccw(c176.058,336.927) 176.058,336.868 176.479,336.868 179.929,336.868 180.325,337.264 v4(181.933,337.264) 182.776,337.264 183.18,337.668 183.711,337.668 183.937,337.442 183.937,337.051 184.121,336.868 185.89,336.868 186.606,336.868 ccw(c186.606,336.937) 186.675,336.937 186.675,337.037 cw(c186.745,337.037) 186.745,337.106 186.952,337.106 cw(c186.952,337.037) 187.022,337.037 187.022,336.868 187.022,336.698 ccw(c187.091,336.698) 187.091,336.629 187.299,336.629 ccw(c187.299,336.698) 187.368,336.698 187.368,336.798 cw(c187.437,336.798) 187.437,336.868 187.541,336.868 191.389,336.868 191.785,337.264 v4(193.393,337.264) 193.4,337.257 194.34,337.257 194.773,337.689 195.368,337.689 195.512,337.545 196.088,337.545 196.477,337.545 cw(c196.477,337.456) 196.566,337.456 196.566,337.105 ccw(c196.656,337.105) 196.656,337.016 196.925,337.016 ccw(c196.925,337.105) 197.014,337.105 197.014,337.456 cw(c197.104,337.456) 197.104,337.545 197.372,337.545 cw(c197.372,337.456) 197.462,337.456 197.462,337.105 ccw(c197.551,337.105) 197.551,337.016 197.82,337.016 ccw(c197.82,337.105) 197.91,337.105 197.91,337.456 cw(c197.999,337.456) 197.999,337.545 198.268,337.545 cw(c198.268,337.456) 198.357,337.456 198.357,337.105 ccw(c198.447,337.105) 198.447,337.016 198.716,337.016 ccw(c198.716,337.105) 198.805,337.105 198.805,337.456 cw(c198.895,337.456) 198.895,337.545 199.164,337.545 cw(c199.164,337.456) 199.253,337.456 199.253,337.119 ccw(c199.343,337.119) 199.343,337.03 199.611,337.03 ccw(c199.611,337.119) 199.701,337.119 199.701,337.456 cw(c199.79,337.456) 199.79,337.545 200.059,337.545 cw(c200.059,337.456) 200.149,337.456 200.149,337.105 ccw(c200.238,337.105) 200.238,337.016 200.507,337.016 ccw(c200.507,337.105) 200.596,337.105 200.596,337.456 cw(c200.686,337.456) 200.686,337.545 200.82,337.545 201.498,336.868 202.54,336.868 202.936,337.264 v15(204.853,337.264)
  L5 (Sign) w0.151: v1(168.812,343.555) 169.377,342.989 169.377,341.085
  L3 (Sign) w0.092: v6(185.91,317.027) 185.995,316.941 185.995,316.395 188.205,314.185 188.205,313.98 188.747,313.439 190.312,313.439 190.454,313.581 191.069,313.581 191.513,314.025 191.513,314.18 191.731,314.398 192.038,314.398 192.187,314.249 194.226,314.249 199.39,319.413 199.39,319.418 200.219,320.247 200.36,320.387 200.57,320.598 cw(c200.64,320.528) 200.711,320.598 200.966,320.342 ccw(c201.036,320.413) 201.106,320.342 201.247,320.483 ccw(c201.176,320.553) 201.247,320.623 200.991,320.879 cw(c201.061,320.949) 200.991,321.019 201.132,321.159 cw(c201.202,321.089) 201.272,321.159 201.527,320.904 ccw(c201.598,320.974) 201.668,320.904 201.808,321.044 ccw(c201.738,321.114) 201.808,321.185 201.482,321.51 201.157,321.836 cw(c201.227,321.906) 201.157,321.976 201.297,322.117 cw(c201.367,322.046) 201.438,322.117 201.763,321.791 202.089,321.465 ccw(c202.159,321.535) 202.229,321.465 202.37,321.606 ccw(c202.299,321.676) 202.37,321.746 202.044,322.072 201.718,322.397 cw(c201.789,322.467) 201.718,322.538 201.859,322.678 cw(c201.929,322.608) 201.999,322.678 202.325,322.352 202.65,322.027 ccw(c202.72,322.097) 202.791,322.027 202.931,322.167 ccw(c202.861,322.237) 202.931,322.307 202.605,322.633 202.28,322.959 cw(c202.35,323.029) 202.28,323.099 202.42,323.239 cw(c202.49,323.169) 202.56,323.239 202.886,322.914 203.212,322.588 ccw(c203.282,322.658) 203.352,322.588 203.492,322.729 ccw(c203.422,322.799) 203.492,322.869 203.167,323.195 202.841,323.52 cw(c202.911,323.59) 202.841,323.66 202.982,323.801 cw(c203.052,323.731) 203.122,323.801 203.377,323.545 ccw(c203.448,323.616) 203.518,323.545 203.818,323.846 203.818,335.786 204.853,336.822 v15(204.853,337.264)
DDR4_A11: R50.1 U1.AE28 U8.T2 U9.T2 U10.T2 U11.T2 | length 99.6
  L1 w0.116: U9.T2@171.676,340.06 v4(172.079,340.464) ; U11.T2@183.136,340.06 v4(183.54,340.464) ; v6(185.91,315.052) U1.AE28@186.397,315.539 ; U10.T2@194.597,340.06 v4(195,340.464) ; v4(205.653,340.464) U8.T2@206.057,340.06
  L1 w0.155: v6(176.063,343.555) R50.1@176.063,344.8
  L5 (Sign) w0.092: v4(172.079,340.464) 172.3,340.464 173.009,341.173 180.538,341.173 180.633,341.078 ccw(c180.696,341.141) 180.76,341.078 180.824,341.142 cw(c180.888,341.079) 180.951,341.142 181.141,340.952 cw(c181.078,340.889) 181.141,340.826 181.076,340.761 ccw(c181.14,340.698) 181.076,340.635 181.29,340.421 181.643,340.068 182.344,340.068 182.74,340.464 v4(183.54,340.464) 183.774,340.698 184.845,341.77 188.773,341.77 188.862,341.77 ccw(c188.862,341.859) 188.952,341.859 188.952,341.885 cw(c189.042,341.885) 189.042,341.975 189.31,341.975 cw(c189.31,341.885) 189.4,341.885 189.4,341.859 ccw(c189.489,341.859) 189.489,341.77 189.624,341.77 191.402,341.77 193.103,340.068 193.804,340.068 194.2,340.464 v4(195,340.464) 195,342.104 195.123,342.227 198.501,342.227 198.635,342.227 ccw(c198.635,342.316) 198.725,342.316 198.725,342.417 cw(c198.814,342.417) 198.814,342.507 199.083,342.507 cw(c199.083,342.417) 199.173,342.417 199.173,342.227 199.173,342.054 ccw(c199.262,342.054) 199.262,341.964 199.531,341.964 ccw(c199.531,342.054) 199.62,342.054 199.62,342.227 199.62,342.417 cw(c199.71,342.417) 199.71,342.507 199.979,342.507 cw(c199.979,342.417) 200.068,342.417 200.068,342.227 200.068,342.037 ccw(c200.158,342.037) 200.158,341.947 200.427,341.947 ccw(c200.427,342.037) 200.516,342.037 200.516,342.227 200.516,342.417 cw(c200.606,342.417) 200.606,342.507 200.874,342.507 cw(c200.874,342.417) 200.964,342.417 200.964,342.316 ccw(c201.053,342.316) 201.053,342.227 201.231,342.227 204.239,342.227 204.532,341.933 204.532,340.331 204.796,340.068 205.265,340.068 v4(205.653,340.464)
  L3 (Sign) w0.092: v4@172.162,340.547 v4(172.079,340.464) 173.284,340.464 173.905,341.085 ; v6@185.847,314.99 v6(185.91,315.052) 185.561,315.052 184.049,313.539 182.943,313.539 182.423,314.06 182.423,315.761 182.867,316.206 182.867,318.567 191.745,327.444 191.745,334.372 192.317,334.944 192.317,335.956 193.127,336.766 196.05,336.766 200.99,341.706 201.473,341.706 202.307,341.706 ccw(c202.307,341.796) 202.396,341.796 202.396,341.854 cw(c202.486,341.854) 202.486,341.944 202.754,341.944 cw(c202.754,341.854) 202.844,341.854 202.844,341.796 ccw(c202.933,341.796) 202.933,341.706 203.202,341.706 ccw(c203.202,341.796) 203.292,341.796 203.292,341.854 cw(c203.381,341.854) 203.381,341.944 203.65,341.944 cw(c203.65,341.854) 203.739,341.854 203.739,341.796 ccw(c203.829,341.796) 203.829,341.706 204.187,341.706 204.411,341.706 v4(205.653,340.464)
  L3 (Sign) w0.151: 173.905,341.085 176.054,343.234 176.054,343.546 v6(176.063,343.555)